# Altium PCB PCB1.pcbdoc
Units mil, origin at the board's own origin, x right, y up, seen from the top; angles counter-clockwise.
Board outline 3240 x 2500 mil, 2 copper layers (Top Layer, Bottom Layer); 13 components, 12 nets, 31 pads, 0 vias.
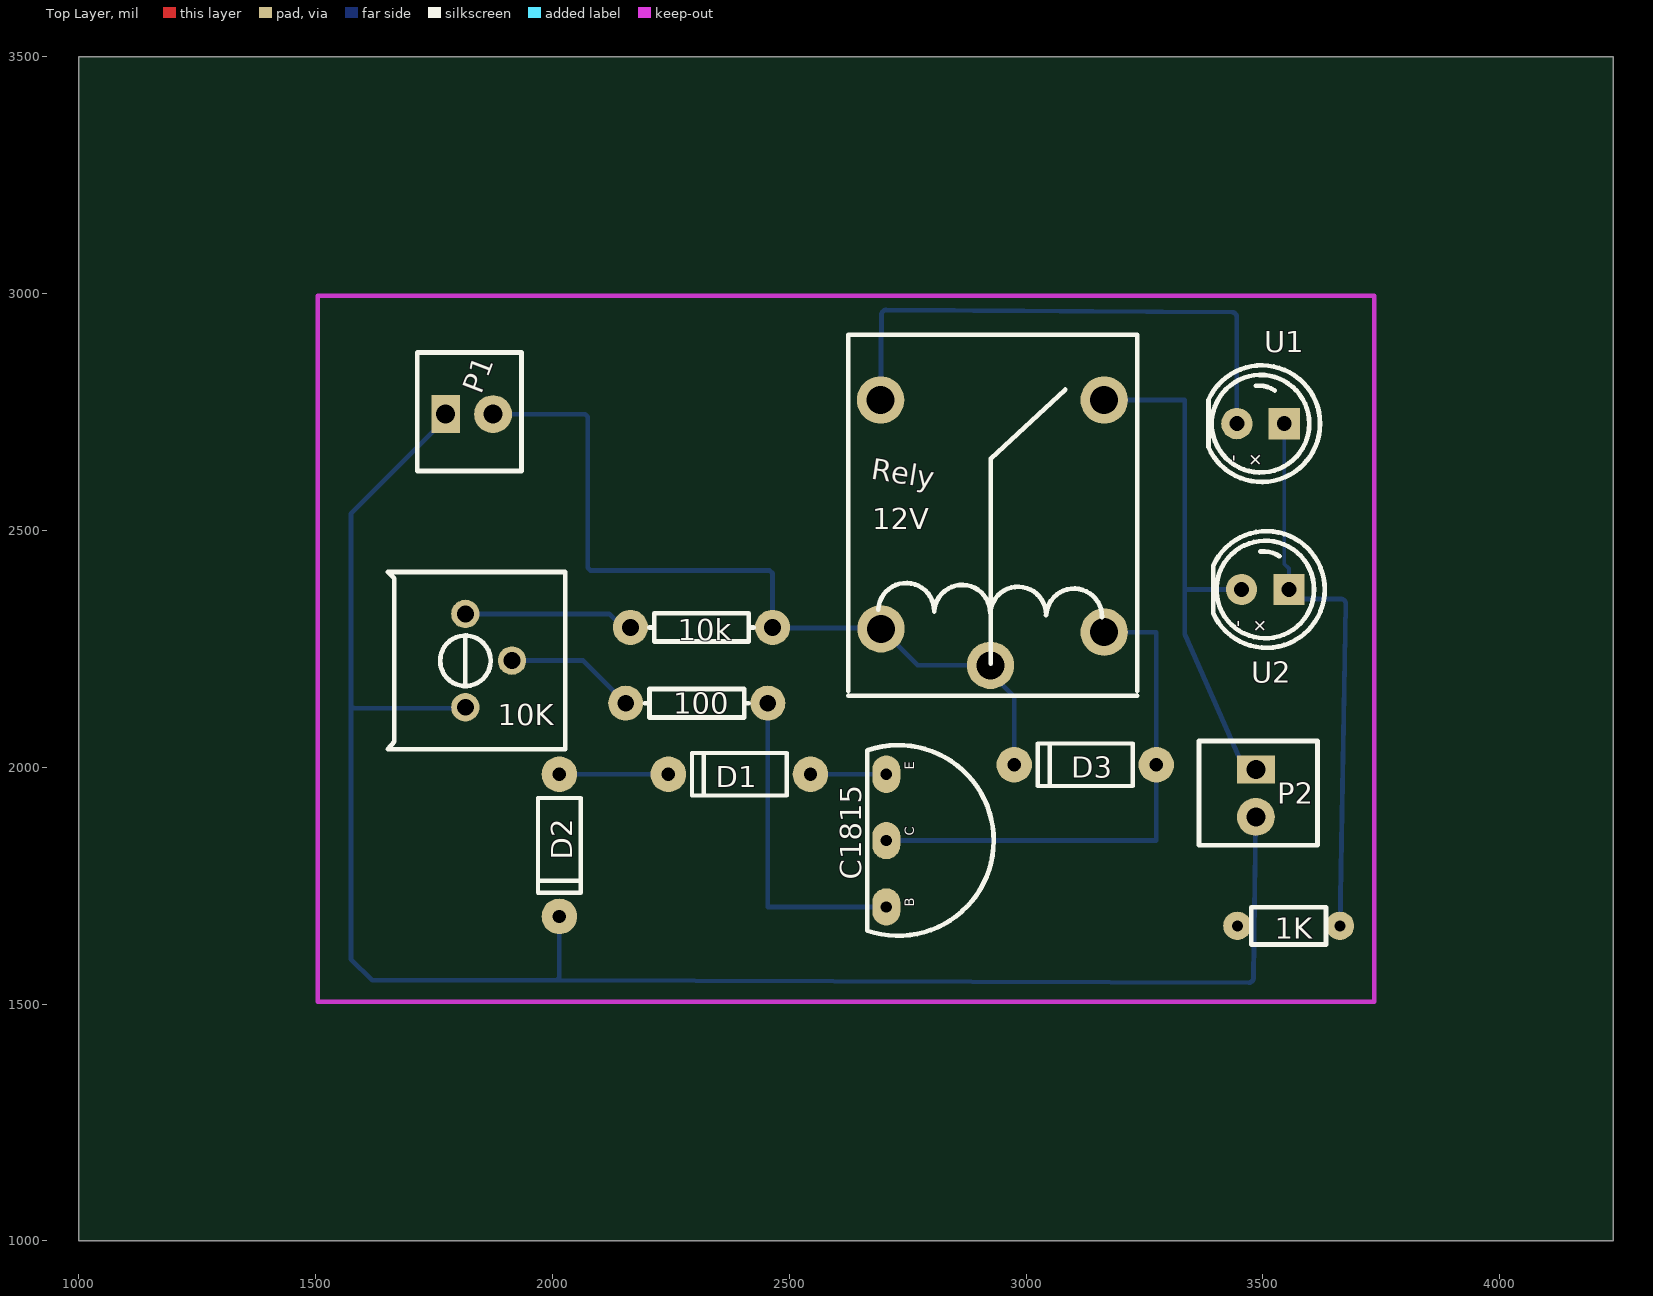
[diagram p0: Top Layer view]
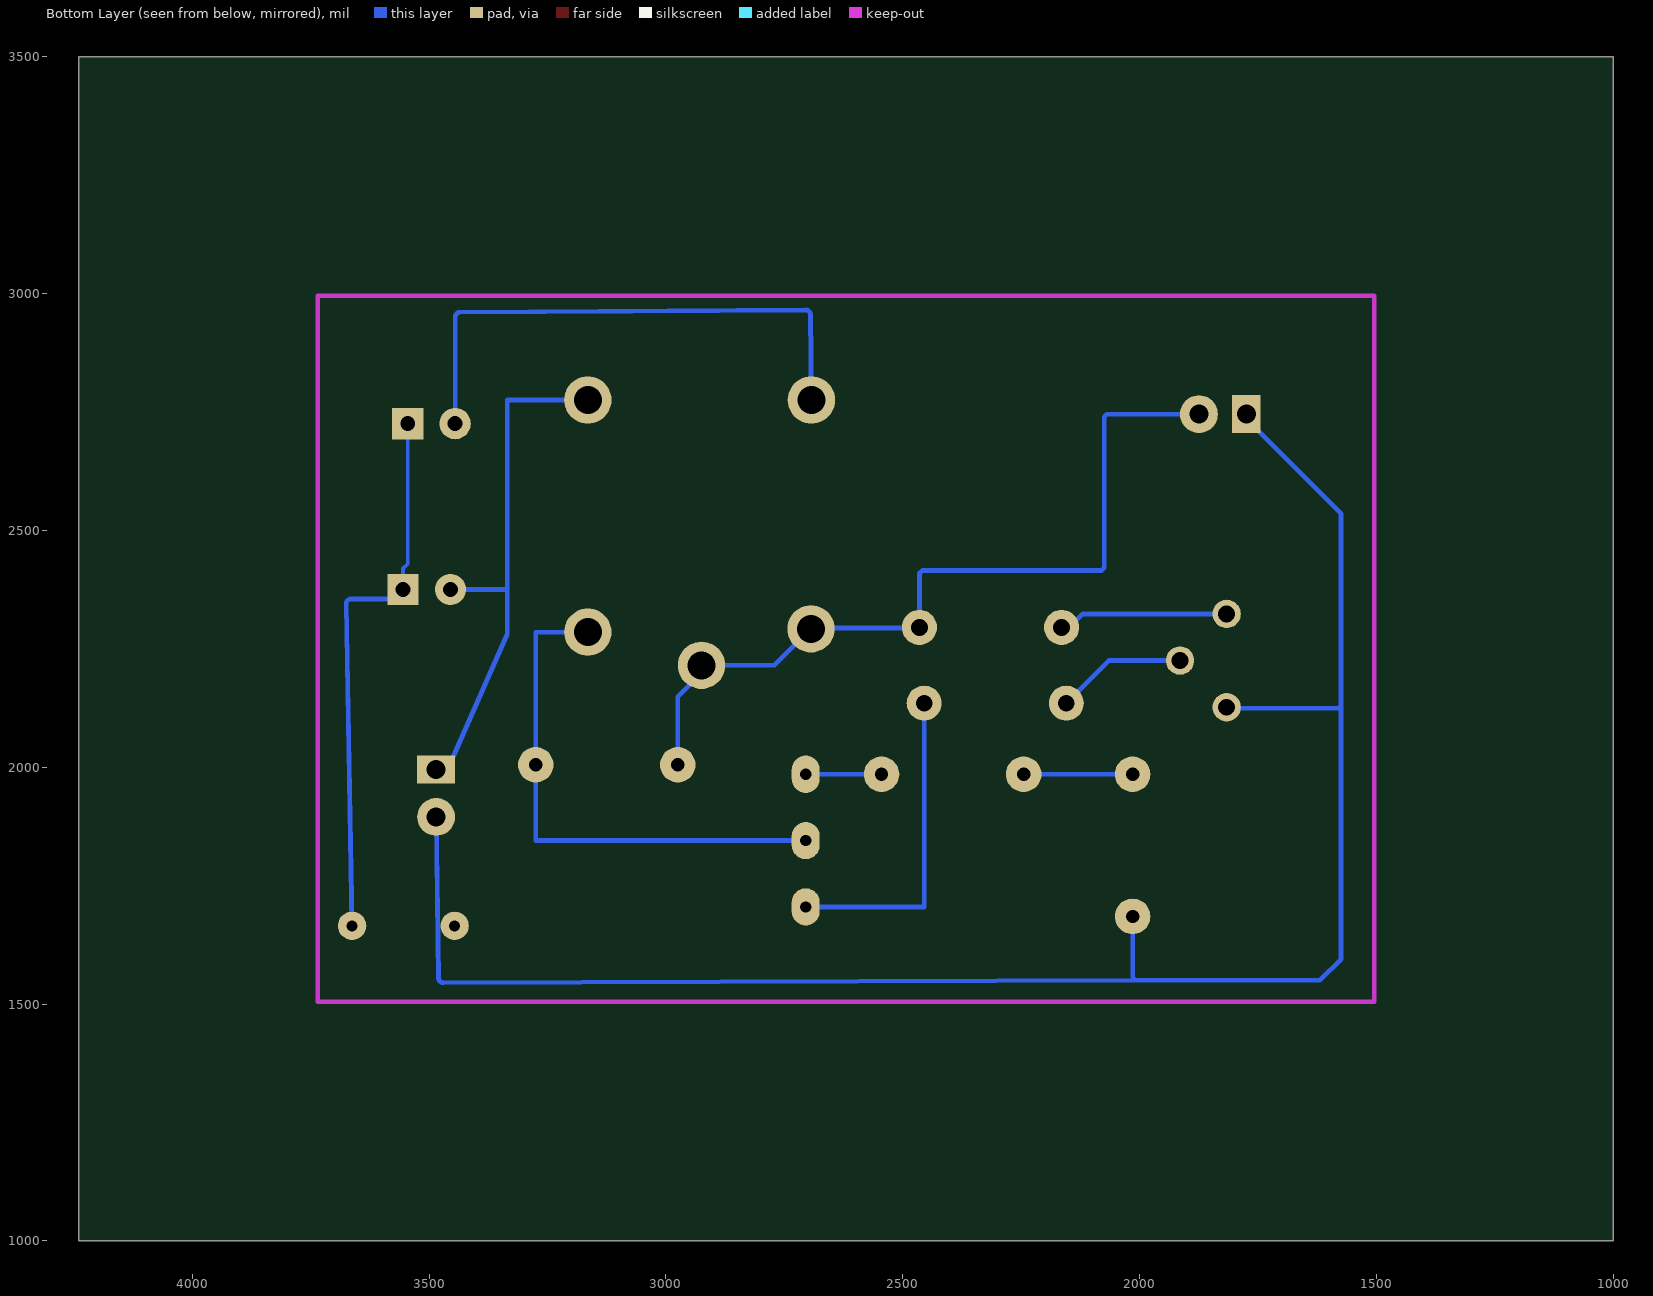
[diagram p1: Bottom Layer view, seen from below]

## Layer stack, top to bottom
Top Solder: solder mask 0.4, Solder Resist, Dk 3.5
Top Layer: signal copper 1.4
Dielectric1: dielectric 12.6, FR-4, Dk 4.8
Bottom Layer: signal copper 1.4
Bottom Solder: solder mask 0.4, Solder Resist, Dk 3.5

## Board outline
4240,1000 1000,1000 1000,3500 4240,3500

## Design rules (kind name [scope] priority, off if disabled: settings)
Clearance [All] p1: gap=10 ignorepadtopadclearanceinfootprint=FALSE
PolygonConnect [All] p1: connectstyle=Relief reliefconductorwidth=10 reliefentries=4 polygonreliefangle="90 Angle" airgapwidth=10
RoutingVias [All] p1: holewidth=28 width=50 viastyle="Through Hole" minholewidth=28 minwidth=50 maxholewidth=28 maxwidth=50
SolderMaskExpansion [All] p1: expansion=0 istentingtop=FALSE
Width [All] p1: maxlimit=10 minlimit=10 preferedwidth=10
30 further rules are at their usual default settings.

## Components (designator, comment, footprint, x,y, rotation, side; value= is the part's Value field where it differs from the comment)
1K "1K" "1/8W Resistor 1k" 3515,1665 r0 top
10K "10k" RES-ADJ_3386P 1915,2225 r0 top
10k "10k" AXIAL-0.3 2315,2295 r0 top
100 "100R" AXIAL-0.3 2305,2135 r0 top
C1815 "C1815" C1815 2665,2055 r270 top
D1 "1N4007" DO-35 2545,1985 r180 top
D2 "1N4007" DO-35 2015,1985 r270 top
D3 "1N4007" DO-35 3275,2005 r180 top
P1 "3Pole connector" "PCB 2pole screw terminal block 2.54" 1575,2645 r90 top
P2 "3Pole connector" "PCB 2pole screw terminal block 2.54" 3385,2195 r0 top
Rely "Relay-12V" HRS4H-S-DC12V 3165,2275 r180 top
U1 "-LED" LED5 3495,2725 r0 top
U2 "-LED" LED5 3505,2375 r0 top

## Footprints (in the part's own frame and the unit in brackets; to place one, negate y for a bottom-side part, rotate by r counter-clockwise, add the part's x,y. Pads: shape width x height; smd on the part's side, far side on the other; paste and mask are expansions set on the pad)
"1/8W Resistor 1k" [mil]
  round 60 hole 23.6 paste-99999 mask+2: 1(-68.9,0) 2(147.6,0)
  silkscreen extent -39,-39 118,39
AXIAL-0.3 [mil]
  round 74 hole 35.4 paste-99999 mask+2: 1(-150,0) 2(150,0)
  silkscreen extent -110,-30 110,30
C1815 [mm]
  oval 2x1.5 hole 0.599 paste-2539.97 mask+0.051: 1(1.778,1.016) 2(5.334,1.016) 3(8.89,1.016)
  silkscreen extent 0.22,0 10.44,6.77
DO-35 [mil]
  round 75 hole 28 paste-99999 mask+2: 1(0,0) 2(300,0)
  silkscreen extent 50,-45 250,45
HRS4H-S-DC12V [mil]
  round 100 hole 59.06 paste-99999 mask+2: 1(0,-10) 2(471,-17) 3(0,-500) 4(472,-500) 5(240,60)
  silkscreen extent -70,-638 540,124
LED5 [mil]
  round 66 hole 31.4 paste-99999 mask+2: ANODE(-50,0)
  rect 66x66 hole 31.4 paste-99999 mask+2: CATHODE(50,0)
  silkscreen extent -110,-123 126,123
"PCB 2pole screw terminal block 2.54" [mil]
  rect 80x60 hole 40 paste-99999 mask+2: 1(100,-200)
  round 80 hole 40 paste-99999 mask+2: 2(100,-300)
  silkscreen extent -20,-360 230,-140
RES-ADJ_3386P [mil]
  round 60 hole 35.43 paste-99999 mask+2: 1(-98.4,98.4) 2(0,0) 3(-98.4,-98.5)
  silkscreen extent -262,-187 112,187

## Nets (pads, with @x,y where several pads share a name; then routed paths per layer and width w, separated by ;. In a path a pad name is that pad's centre, name@x,y a point inside that pad or via, vN(x,y) a via of type N, cw(c..) or ccw(c..) an arc to the next point about the centre after c; other vN are vias at no path point)
1K_2: 1K.2 U1.CATHODE U2.CATHODE | length 1180.3
  Top Layer w10: U2.CATHODE@3545,2385 U2.CATHODE
  Bottom Layer w8: U1.CATHODE 3545,2429 3555,2419 U2.CATHODE
  Bottom Layer w10: U2.CATHODE 3583,2355 3664.82,2355 cw(c3664.82,2345) 3674.82,2344.82 1K.2
D1_2: D1.2 D2.1 | length 230
  Bottom Layer w10: D2.1 D1.2
D2_2: 1K.1 10K.3 D2.2 P1.1 P2.2 | length 3884.8
  Bottom Layer w10: P1.1 1775,2735 1575,2535 1575,2130 ; 10K.3 1814.24,2124.14 1580.86,2124.14 1575,2130 ; D2.2 2015,1555.86 2009.14,1550 ; 3470.11,1545.03 2009.14,1550 ; 3470.14,1545.03 ccw(c3470.14,1555.03) 3480.14,1554.89 P2.2 ; 1575,2130 1575,1595 1620,1550 2009.14,1550
K1_3: P2.1 Rely.3 U2.ANODE | length 1112.2
  Bottom Layer w10: Rely.3 3335,2775 3335,2375 ; U2.ANODE 3335,2375 ; P2.1 3450,2020 3335.85,2278.43 cw(c3345,2282.47) 3335,2282.47 3335,2375
K1_4: Rely.4 U1.ANODE | length 1180.7
  Top Layer w10: U1.ANODE U1.ANODE@3455,2735
  Bottom Layer w10: Rely.4 2694.9,2955.04 cw(c2704.89,2954.93) 2704.96,2964.93 3435.07,2960.07 ; 3435.09,2960.07 cw(c3435,2950.07) 3445,2950.07 U1.ANODE
Q1_1: C1815.1 D1.1 | length 160
  Bottom Layer w10: D1.1 C1815.1
Q1_2: C1815.2 D3.1 Rely.1 | length 1120
  Bottom Layer w10: C1815.2 3275,1845 D3.1 3275,2285 Rely.1
Q1_3: 100.2 C1815.3 | length 680
  Bottom Layer w10: 100.2 2455,1705 C1815.3
R1_1: 10K.2 100.1 | length 277.3
  Bottom Layer w10: 10K.2 2065,2225 100.1
R2_1: 10k.1 10K.1 | length 360.2
  Bottom Layer w10: 10K.1 2119.86,2323.4 2148.26,2295 10k.1
R3_2: 10k.2 D3.2 P1.2 Rely.2 Rely.5 | length 1757.8
  Top Layer w22: Rely.2@2691,2295 Rely.2
  Bottom Layer w10: P1.2 2069.14,2745 2075,2739.14 2075,2420.86 2080.86,2415 2459.14,2415 2465,2409.14 10k.2 2466.5,2293.5 2692.5,2293.5 Rely.2 2771,2215 Rely.5 2925,2198.2 2975,2148.2 D3.2
S$24: 

## Silkscreen, mask and mechanical layers (free items; w line width, h text height)
Top Overlay:
  text "12V" at 2675,2502.5 h45
Document:
  lines w0.1: 2619.99,2249.99 2620.01,2250.01

## Text inside footprints (layer, text, board x,y; h text height)
C1815: Top Overlay "B" at 2764.14,1705 h19.68 r90; Top Overlay "C" at 2764.14,1855 h19.68 r90; Top Overlay "E" at 2764.14,1995 h19.68 r90
U1: Top Overlay "+" at 3505.61,2645.61 h30 r135; Top Overlay "-" at 3450,2645 h30 r90
U2: Top Overlay "+" at 3515.61,2295.61 h30 r135; Top Overlay "-" at 3460,2295 h30 r90